# Altium PCB PCI Express_16765X6890_64PIN_Low profile_Clear.PCBDOC (part 4 of 9)
Units mm, origin at the board's own origin, x right, y up, seen from the top; angles counter-clockwise.
Board outline 80.71 x 137.84 mm, 6 copper layers (Top Layer, Layer 2 (GND), Layer 3, Layer 4, Layer 5 (AGND), Bottom Layer), stack 1.571 mm thick; 507 components, 297 nets, 1544 pads, 616 vias.
Unrouted connection lines stored in the file: 101.
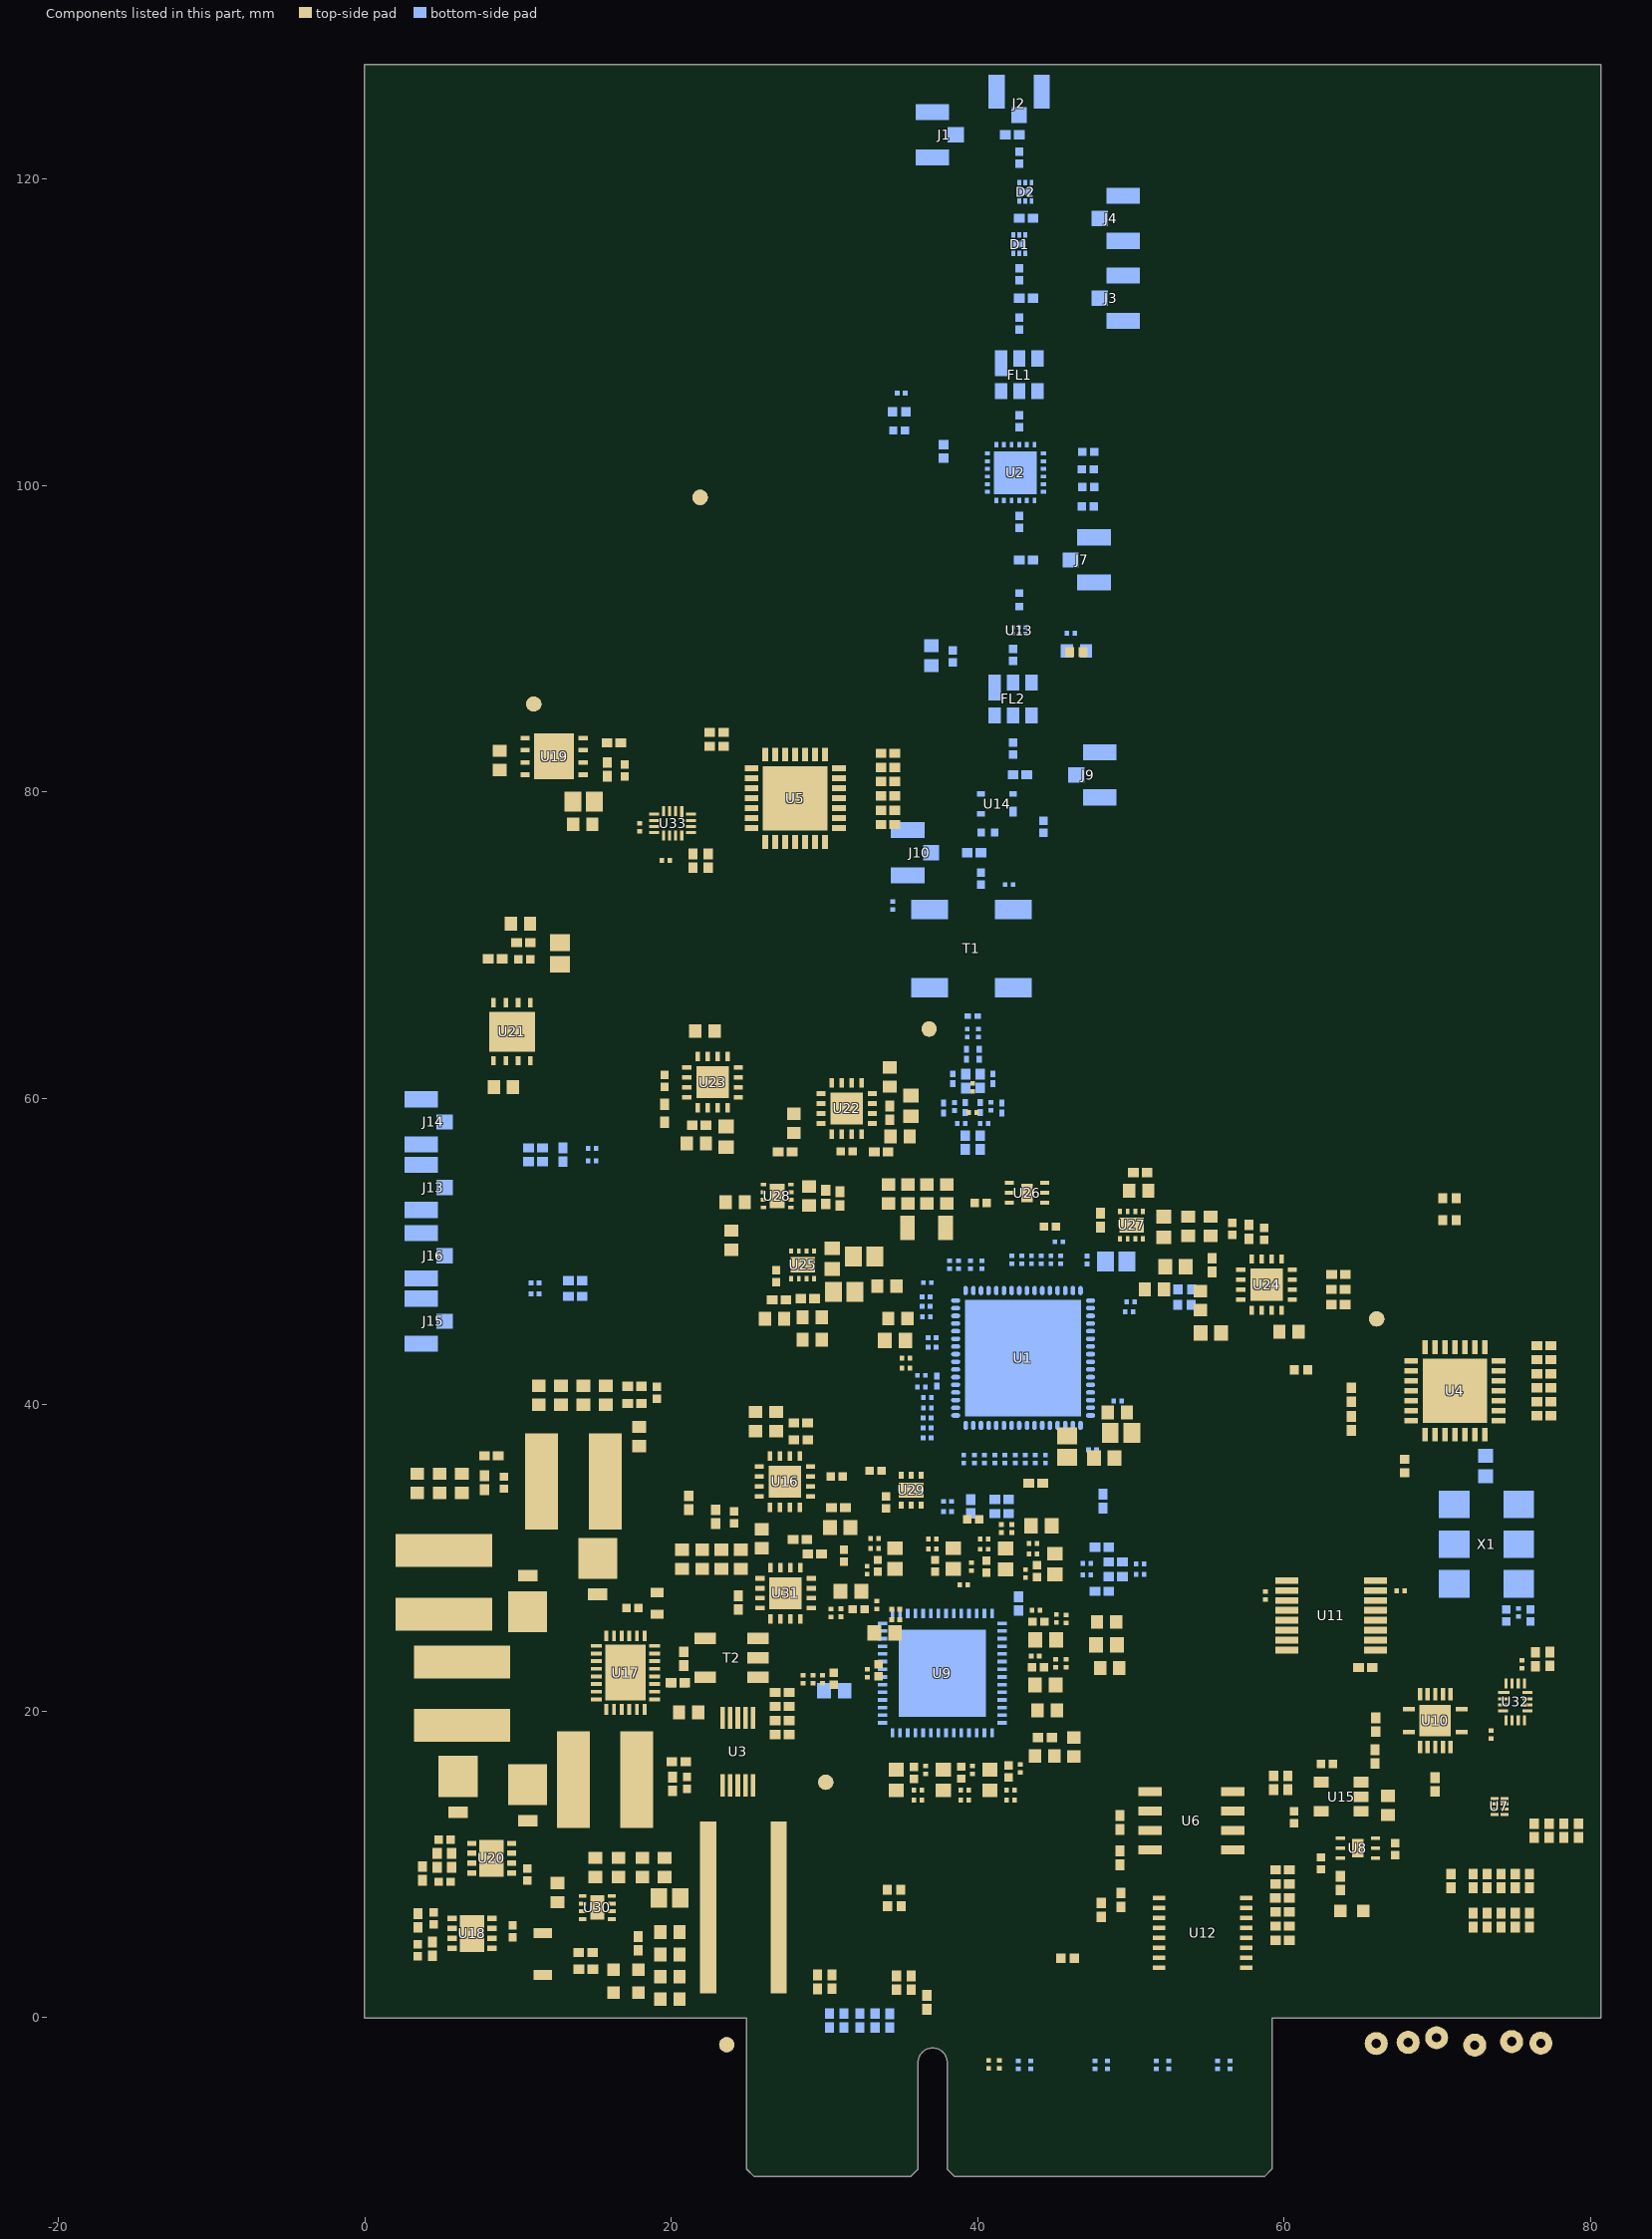
[diagram p4: the components of this part, seen from the top]

## Part data (continued)
FB21: library part Ferrite, Case/Package=0603, Case Code (Metric)=1608, Current Rating=3A, DC Resistance (DCR)=25mR, Frequency=100MHz, Manufacturer 1=Murata, Manufacturer Part Number 1=BLM18SG121TN1D, Max Operating Temperature=125°C, Min Operating Temperature=-55°C, Package Quantity=1, Supplier Part Number 1=490-3996-1-ND, Tolerance=25%, Case Code (Imperial)=0603, ComponentLink1Description=https://datasheet.ciiva.com/1012/l0110s0100blm18s-1012624.pdf?src-supplier=Digi-Key, ComponentLink1URL=https://datasheet.ciiva.com/1012/l0110s0100blm18s-1012624.pdf?src-supplier=Digi-Key, ComponentLink2Description=https://datasheet.ciiva.com/18093/getdatasheetpartid-295885-18093249.pdf?src-supplier=Verical, ComponentLink2URL=https://datasheet.ciiva.com/18093/getdatasheetpartid-295885-18093249.pdf?src-supplier=Verical, ComponentLink3Description=https://datasheet.ciiva.com/11799/0900766b811b5866-11799181.pdf?src-supplier=RSComponents, ComponentLink3URL=https://datasheet.ciiva.com/11799/0900766b811b5866-11799181.pdf?src-supplier=RSComponents, ComponentLink4Description=https://datasheet.ciiva.com/41449/001171723-da-01-en-chip-drossel0603-120r-3000ma-1-6x0-8mm-41449353.pdf?src-supplier=Conrad, ComponentLink4URL=https://datasheet.ciiva.com/41449/001171723-da-01-en-chip-drossel0603-120r-3000ma-1-6x0-8mm-41449353.pdf?src-supplier=Conrad, ComponentLink5Description=https://datasheet.ciiva.com/41449/001172312-da-01-en-drossel-0603-120r-1-6x0-8mm-10000st-41449675.pdf?src-supplier=Conrad, ComponentLink5URL=https://datasheet.ciiva.com/41449/001172312-da-01-en-drossel-0603-120r-1-6x0-8mm-10000st-41449675.pdf?src-supplier=Conrad, ComponentLink6Description=https://datasheet.ciiva.com/1012/l0110s0100blm18s-1012625.pdf?src-supplier=Digi-Key, ComponentLink6URL=https://datasheet.ciiva.com/1012/l0110s0100blm18s-1012625.pdf?src-supplier=Digi-Key, ComponentLink7Description=https://datasheet.ciiva.com/8021/5151-8021511.pdf?src-supplier=Element14, ComponentLink7URL=https://datasheet.ciiva.com/8021/5151-8021511.pdf?src-supplier=Element14, ComponentLink8Description=https://datasheet.ciiva.com/8021/5151-8021512.pdf?src-supplier=Element14, ComponentLink8URL=https://datasheet.ciiva.com/8021/5151-8021512.pdf?src-supplier=Element14, ComponentLink9Description=https://datasheet.ciiva.com/14122/blm-series-eng-tds-14122906.pdf?src-supplier=Distrelec, ComponentLink9URL=https://datasheet.ciiva.com/14122/blm-series-eng-tds-14122906.pdf?src-supplier=Distrelec, ComponentLink10Description=https://datasheet.ciiva.com/16395/l0110s0100blm18s-16395498.pdf?src-supplier=Future+Electronics, ComponentLink10URL=https://datasheet.ciiva.com/16395/l0110s0100blm18s-16395498.pdf?src-supplier=Future+Electronics, ComponentLink11Description=https://datasheet.ciiva.com/1012/l0110s0100blm18s-1012623.pdf?src-supplier=Digi-Key, ComponentLink11URL=https://datasheet.ciiva.com/1012/l0110s0100blm18s-1012623.pdf?src-supplier=Digi-Key, ComponentLink12Description=https://datasheet.ciiva.com/17246/l0110s0100blm18s-17246943.pdf?src-supplier=Avnet+Europe, ComponentLink12URL=https://datasheet.ciiva.com/17246/l0110s0100blm18s-17246943.pdf?src-supplier=Avnet+Europe, Core Material=Ferrite, Depth=0.8mm, Height=0.8mm, Impedance=120R, Lead Free="Lead Free", Length=1.6mm, Material=Steel,Ferrite, Max Current Rating=3A, Max DC Current=3A, Number of Circuits=1, Number of Lines=1, Number of Pins=2, Packaging="Tape and Reel", Pricing 1="1=0.14000, 10=0.11600, 25=0.09040, 50=0.07500, 100=0.06460, 250=0.05172, 500=0.04654, 1000=0.03878, 5000=0.03619 (USD)", REACH SVHC="No SVHC", RoHS=Yes, Shielding=Unshielded, Stock 1=186560, Supplier 1=Digi-Key, Termination=SMD/SMT, Test Frequency=100MHz, Width=0.8mm
FID1 FID2 FID3 FID4 FID5 FID6: library part Fid
FL1 FL2: "SAW Filter 1570 MHz", In Power (max)="10 dBm", BW="80 MHz", Fc="1570 MHz", IL (max)="4.2 dB", Impedance In, Out="50 Ohm"
J1 J2 J3 J4 J7 J9 J10 J13 J14 J15 J16: "Ultra Miniature Coaxial Connector Jack, 60 V, 50 Ohm, -40 to 90 degC, RoHS, Tape and Reel", Maximum Frequency="6 GHz", Operating Temperature Range="- 40 C to + 90 C", Supplier Part Number 1=62X0488, Body Material="Liquid Crystal Polymer (LCP)", Brand="TE Connectivity / AMP", ComponentLink1Description="Manufacturer URL", ComponentLink1URL=http://www.te.com, ComponentLink2Description=Datasheet, ComponentLink2URL=http://www.te.com/commerce/DocumentDelivery/DDEController?Action=srchrtrv&DocNm=1909763&DocType=Customer+Drawing&DocLang=English, Contact Material="Copper Alloy", Contact Plating=Gold, DatasheetVersion="Rev. B2", Factory Pack Quantity=5000, Gender="Jack (Female)", Impedance="50 Ohms", Mounting Technology="Surface Mount", Orientation=Straight, PackageDescription="3-Pin Surface Mount Device, Body 2.6 x 2.6 mm", PackageReference=SMD, Packaging=Reel, Product=Connectors, Product Category="RF Connectors / Coaxial Connectors", RF Series=UMCC, RoHS=Details, Supplier 1=Newark, Supplier 2=Farnell, Supplier 3=Digi-Key, Supplier 4=Digi-Key, Supplier 5=Digi-Key, Supplier Part Number 2=2781689, Supplier Part Number 3=A118077TR-ND, Supplier Part Number 4=A118077CT-ND, Supplier Part Number 5=A118077DKR-ND
L1: library part IND_WW, Case/Package=0402, Case Code (Metric)=1005, Current Rating=540mA, DC Resistance (DCR)=140mR, Manufacturer 1=Murata, Manufacturer Part Number 1=LQW15AN8N2J00D, Max Operating Temperature=125°C, Min Operating Temperature=-55°C, Package Quantity=1, Self Resonant Frequency=5.5GHz, Supplier Part Number 1=490-1144-1-ND, Test Frequency=100MHz, Tolerance=5%, Case Code (Imperial)=0402, ComponentLink1Description=https://datasheet.ciiva.com/11799/0900766b8090d800-11799046.pdf?src-supplier=RSComponents, ComponentLink1URL=https://datasheet.ciiva.com/11799/0900766b8090d800-11799046.pdf?src-supplier=RSComponents, ComponentLink2Description=https://datasheet.ciiva.com/1042/l0075s0080lqw15a-00-1042176.pdf?src-supplier=Digi-Key, ComponentLink2URL=https://datasheet.ciiva.com/1042/l0075s0080lqw15a-00-1042176.pdf?src-supplier=Digi-Key, ComponentLink3Description=https://datasheet.ciiva.com/17278/l0075s0080lqw15a-00-17278345.pdf?src-supplier=Avnet+Europe, ComponentLink3URL=https://datasheet.ciiva.com/17278/l0075s0080lqw15a-00-17278345.pdf?src-supplier=Avnet+Europe, ComponentLink4Description=https://datasheet.ciiva.com/8506/l0075s0080lqw15a-00-8506028.pdf?src-supplier=Avnet, ComponentLink4URL=https://datasheet.ciiva.com/8506/l0075s0080lqw15a-00-8506028.pdf?src-supplier=Avnet, ComponentLink5Description=https://datasheet.ciiva.com/1042/l0075s0080lqw15a-00-1042174.pdf?src-supplier=Digi-Key, ComponentLink5URL=https://datasheet.ciiva.com/1042/l0075s0080lqw15a-00-1042174.pdf?src-supplier=Digi-Key, ComponentLink6Description=https://datasheet.ciiva.com/1042/l0075s0080lqw15a-00-1042175.pdf?src-supplier=Digi-Key, ComponentLink6URL=https://datasheet.ciiva.com/1042/l0075s0080lqw15a-00-1042175.pdf?src-supplier=Digi-Key, Core Material=Air,Ferrite, DC Current=540mA, Depth=0.7mm, Height=0.5mm, Inductance=8.2nH, Lead Free="Lead Free", Length=1mm, Max DC Current=540mA, Military Standard=Not, Mount="Surface Mount", Packaging="Tape and Reel", Pricing 1="1=0.17000, 10=0.15500, 100=0.10350, 500=0.08626, 1000=0.07245, 2500=0.06210 (USD)", Q Factor=25, Radiation Hardening=No, RoHS=Yes, Shielding=Unshielded, Stock 1=37106, Supplier 1=Digi-Key, Termination=SMD/SMT, Weight=2.8E-05oz, Width=0.02inch
L2: library part IND_WW, Case/Package=0402, Case Code (Metric)=1005, Current Rating=350mA, DC Resistance (DCR)=380mR, Inductance Tolerance=5%, Manufacturer 1=TDK, Manufacturer Part Number 1=MLK1005S8N2D, Max Operating Temperature=125°C, Min Operating Temperature=-55°C, Package Quantity=10000, Self Resonant Frequency=6GHz, Supplier Part Number 1=445-1466-1-ND, Test Frequency=100MHz, Case Code (Imperial)=0402, ComponentLink1Description=https://datasheet.ciiva.com/15160/getdatasheetpartid-160177-15160588.pdf?src-supplier=Verical, ComponentLink1URL=https://datasheet.ciiva.com/15160/getdatasheetpartid-160177-15160588.pdf?src-supplier=Verical, ComponentLink2Description=https://datasheet.ciiva.com/5707/321063-5707269.pdf?src-supplier=Farnell, ComponentLink2URL=https://datasheet.ciiva.com/5707/321063-5707269.pdf?src-supplier=Farnell, ComponentLink3Description=https://datasheet.ciiva.com/6685/mlk1005-6685740.pdf?src-supplier=Digi-Key, ComponentLink3URL=https://datasheet.ciiva.com/6685/mlk1005-6685740.pdf?src-supplier=Digi-Key, ComponentLink4Description=https://datasheet.ciiva.com/22710/321063-22710636.pdf?src-supplier=Element14, ComponentLink4URL=https://datasheet.ciiva.com/22710/321063-22710636.pdf?src-supplier=Element14, ComponentLink5Description=https://datasheet.ciiva.com/6685/mlk1005-6685738.pdf?src-supplier=Digi-Key, ComponentLink5URL=https://datasheet.ciiva.com/6685/mlk1005-6685738.pdf?src-supplier=Digi-Key, Core Material=Non-Magnetic,Ceramic, DC Current=350mA, Depth=0.5mm, Height=0.5mm, Height - Seated (Max)=0.024inch, Inductance=8.2nH, Lead Free="Lead Free", Length=1mm, Max DC Current=350mA, Military Standard=Not, Mount="Surface Mount", Number of Pins=2, Packaging="Tape and Reel", Pricing 1="1=0.10000, 10=0.05200, 100=0.03450, 500=0.02876, 1000=0.02415, 2500=0.02070 (USD)", Q Factor=25, Radiation Hardening=No, REACH SVHC="No SVHC", RoHS=Yes, Shielding=Unshielded, Stock 1=18018, Supplier 1=Digi-Key, Termination=SMD/SMT, Tolerance=5%, Width=0.02inch
L3: library part CDRH5D28NP-5R3NC, "INDUCTOR POWER 5.3UH 1.90A SMD", Inductance="4.2 µH", Supplier Part Number 1=308-2193-1-ND, Supplier 1=Digi-Key
L4: library part Inductor, "Fixed Inductors 6.8uH", Case/Package=0603, Case Code (Metric)=1608, Current Rating=75mA, DC Resistance (DCR)=900mR, Manufacturer 1=TDK, Manufacturer Part Number 1=GLFR1608T150M-LR, Max DC Current=220mA, Max Operating Temperature=105°C, Min Operating Temperature=-40°C, Package Quantity=4000, Supplier Part Number 1=445-6151-1-ND, Tolerance=20%, Case Code (Imperial)=0603, ComponentLink1Description=https://datasheet.ciiva.com/1040/glfrseries-1040824.pdf?src-supplier=Digi-Key, ComponentLink1URL=https://datasheet.ciiva.com/1040/glfrseries-1040824.pdf?src-supplier=Digi-Key, ComponentLink2Description=https://datasheet.ciiva.com/1040/glfrseries-1040825.pdf?src-supplier=Digi-Key, ComponentLink2URL=https://datasheet.ciiva.com/1040/glfrseries-1040825.pdf?src-supplier=Digi-Key, ComponentLink3Description=https://datasheet.ciiva.com/1040/glfrseries-1040826.pdf?src-supplier=Digi-Key, ComponentLink3URL=https://datasheet.ciiva.com/1040/glfrseries-1040826.pdf?src-supplier=Digi-Key, Height=0.031inch, Inductance=15uH, Length=1.6mm, Mount="Surface Mount", Packaging="Tape and Reel", Pricing 1="1=0.27000, 10=0.24400, 100=0.16760, 500=0.14324, 1000=0.10971 (USD)", RoHS=Yes, Saturation Current=75mA, Shielding=Shielded, Stock 1=4756, Supplier 1=Digi-Key, Termination=SMD/SMT, Width=0.8mm
L5 L6: Inductance [µH]=8.2, Part Number=CDRH5D28NP-8R2, Supplier 2=Digi-Key, Supplier Part Number 2=308-2309-6-ND
L7: library part CDRH5D28NP-100NC, "Inductor Power Shielded Drum Core 10uH 30% 100KHz Ferrite 1.3A 65mOhm DCR T/R", Inductance [µH]=8.2, Part Number=CDRH5D28NP-8R2, Supplier 2=Digi-Key, Supplier Part Number 2=308-2309-6-ND
L8: library part Inductor, Case/Package=1206, Case Code (Metric)=3216, Current Rating=1.2A, DC Resistance (DCR)=120mR, Inductance Tolerance=20%, Manufacturer 1=Murata, Manufacturer Part Number 1=LQM31PN1R0M00L, Max Operating Temperature=125°C, Min Operating Temperature=-55°C, Package Quantity=3000, Self Resonant Frequency=60MHz, Supplier Part Number 1=490-4039-1-ND, Test Frequency=1MHz, Case Code (Imperial)=1206, ComponentLink1Description=https://datasheet.ciiva.com/30490/0900766b812561f7-30490179.pdf?src-supplier=RSComponents, ComponentLink1URL=https://datasheet.ciiva.com/30490/0900766b812561f7-30490179.pdf?src-supplier=RSComponents, ComponentLink2Description=https://datasheet.ciiva.com/18089/getdatasheetpartid-153105-18089643.pdf?src-supplier=Verical, ComponentLink2URL=https://datasheet.ciiva.com/18089/getdatasheetpartid-153105-18089643.pdf?src-supplier=Verical, ComponentLink3Description=https://datasheet.ciiva.com/16456/l0075s0104lqm31p-00-16456023.pdf?src-supplier=Future+Electronics, ComponentLink3URL=https://datasheet.ciiva.com/16456/l0075s0104lqm31p-00-16456023.pdf?src-supplier=Future+Electronics, ComponentLink4Description=https://datasheet.ciiva.com/17278/l0075s0104lqm31p-00-17278552.pdf?src-supplier=Avnet+Europe, ComponentLink4URL=https://datasheet.ciiva.com/17278/l0075s0104lqm31p-00-17278552.pdf?src-supplier=Avnet+Europe, ComponentLink5Description=https://datasheet.ciiva.com/4955/product-4955835.pdf?src-supplier=Mouser, ComponentLink5URL=https://datasheet.ciiva.com/4955/product-4955835.pdf?src-supplier=Mouser, ComponentLink6Description=https://datasheet.ciiva.com/8510/l0075s0104lqm31p-00-8510971.pdf?src-supplier=Avnet, ComponentLink6URL=https://datasheet.ciiva.com/8510/l0075s0104lqm31p-00-8510971.pdf?src-supplier=Avnet, Core Material=Ferrite, DC Current=1.2A, Depth=1.8mm, Height=0.95mm, Height - Seated (Max)=0.037inch, Inductance=1uH, Lead Free="Lead Free", Length=3.4mm, Max DC Current=1.2A, Military Standard=Not, Mount="Surface Mount", Packaging="Tape and Reel", Pricing 1="1=0.40000, 10=0.35100, 100=0.24160, 500=0.20648, 1000=0.15815 (USD)", Radiation Hardening=No, REACH SVHC="No SVHC", RoHS=Yes, Shielding=Shielded, Stock 1=7502, Supplier 1=Digi-Key, Termination=SMD/SMT, Tolerance=20%, Width=0.063inch
L9: "FIXED IND 2.2UH 1.4A 72 MOHM SMD", Case/Package=Nonstandard, Current Rating=1.4A, DC Resistance (DCR)=72mR, Inductance=2.2uH, Manufacturer 1=TDK, Max Operating Temperature=105°C, Min Operating Temperature=-40°C, Package Quantity=2000, Supplier Part Number 1=445-4200-1-ND, Test Frequency=1MHz, Tolerance=20%, ComponentLink1Description=http://components.arrow.com/part/dataview/0323_01997643?src-supplier=Arrow+Europe, ComponentLink1URL=http://components.arrow.com/part/dataview/0323_01997643?src-supplier=Arrow+Europe, ComponentLink2Description=https://media.digikey.com/pdf/Data%20Sheets/TDK%20PDFs/VLF3012S.pdf?src-supplier=Digi-Key, ComponentLink2URL=https://media.digikey.com/pdf/Data%20Sheets/TDK%20PDFs/VLF3012S.pdf?src-supplier=Digi-Key, ComponentLink3Description=http://www.tdk.com/s_details.php?class_code=TJA024&item_roots_key=VLF3012ST-2R2M1R4C46421010&item_name=VLF3012ST-2R2M1R4&src-supplier=Avnet, ComponentLink3URL=http://www.tdk.com/s_details.php?class_code=TJA024&item_roots_key=VLF3012ST-2R2M1R4C46421010&item_name=VLF3012ST-2R2M1R4&src-supplier=Avnet, ComponentLink4Description=https://product.tdk.com/en/search/inductor/inductor/smd/info?part_no=VLF3010AT-2R2M1R0&src-supplier=Mouser, ComponentLink4URL=https://product.tdk.com/en/search/inductor/inductor/smd/info?part_no=VLF3010AT-2R2M1R0&src-supplier=Mouser, Composition=Wirewound, Core Material=Ferrite, DC Current=1.4A, Depth=2.8mm, Height=1.2mm, Height - Seated (Max)=0.047inch, Lead Free="Lead Free", Length=0.118inch, Manufacturer Part Number 1=VLF3012ST-2R2M1R4, Max DC Current=1.4A, Military Standard=Not, Mount="Surface Mount", Packaging="Tape and Reel", Pricing 1="1=1.09000, 10=1.00900, 100=0.72970 (USD)", RoHS=Yes, Shielding=Shielded, Stock 1=348, Supplier 1=Digi-Key, Termination=SMD/SMT, Width=0.11inch
R1 R3 R6 R8 R10 R12: library part Resistor, Case/Package=0201, Case Code (Metric)=0603, Manufacturer 1=Panasonic, Manufacturer Part Number 1=ERJ-1GNF10R0C, Max Operating Temperature=125°C, Max Power Dissipation=50mW, Min Operating Temperature=-55°C, Package Quantity=15000, Supplier Part Number 1=2396827, Temperature Coefficient=200ppm/°C, Tolerance=1%, Voltage Rating=25V, Case Code (Imperial)=0201, ComponentLink1Description=https://datasheet.ciiva.com/17212/aoa0000ce2-17212053.pdf?src-supplier=Avnet+Europe, ComponentLink1URL=https://datasheet.ciiva.com/17212/aoa0000ce2-17212053.pdf?src-supplier=Avnet+Europe, ComponentLink2Description=https://datasheet.ciiva.com/9194/aoa0000ce2-9194214.pdf?src-supplier=Avnet, ComponentLink2URL=https://datasheet.ciiva.com/9194/aoa0000ce2-9194214.pdf?src-supplier=Avnet, ComponentLink3Description=https://datasheet.ciiva.com/16201/aoa0000ce2-16201496.pdf?src-supplier=Future+Electronics, ComponentLink3URL=https://datasheet.ciiva.com/16201/aoa0000ce2-16201496.pdf?src-supplier=Future+Electronics, ComponentLink4Description=https://datasheet.ciiva.com/16511/aoa0000ce2-16511388.pdf?src-supplier=Avnet+Asia, ComponentLink4URL=https://datasheet.ciiva.com/16511/aoa0000ce2-16511388.pdf?src-supplier=Avnet+Asia, ComponentLink5Description=https://datasheet.ciiva.com/43467/1678782-43467006.pdf?src-supplier=Farnell, ComponentLink5URL=https://datasheet.ciiva.com/43467/1678782-43467006.pdf?src-supplier=Farnell, ComponentLink6Description=https://datasheet.ciiva.com/24161/aoa0000ce2-24161967.pdf?src-supplier=Mouser, ComponentLink6URL=https://datasheet.ciiva.com/24161/aoa0000ce2-24161967.pdf?src-supplier=Mouser, Composition="Thick Film", Contact Plating=Tin,Matte, Height=0.01inch, Lead Free="Lead Free", Length=0.6mm, Mount="Surface Mount", Number of Pins=2, Number of Terminations=2, Packaging="Tape and Reel", Power Rating=50mW, Radiation Hardening=No, REACH SVHC="No SVHC", Resistance=10R, RoHS=Yes, Stock 1=135000, Supplier 1=Farnell, Termination=SMD/SMT, Voltage Rating (DC)=25V, Weight=6E-06oz, Width=0.012inch, Working Voltage=25V
R2 R4 R11 R13 R20 R22 R25 R26 R36 R39 R40 R42 R43 R44 R45 R47 R48 R49 R77 R78 R89 R90 R91 R92 R93 R94 R96 R97 R98 R99 R101 R104 R105 R111 R112 R116 R117 R118 R119 R120 R121 R122 R129 R130 R131 R134 R135 R141 R142 R143: library part Resistor, Case/Package=0402, Case Code (Metric)=1005, Manufacturer 1=Yageo, Manufacturer Part Number 1=RC0402JR-070RL, Max Operating Temperature=155°C, Max Power Dissipation=63mW, Min Operating Temperature=-55°C, Package Quantity=1, Power Rating=62.5mW, Supplier Part Number 1=311-0.0JRCT-ND, Temperature Coefficient=200ppm/°C, Tolerance=5%, Voltage Rating=50V, Case Code (Imperial)=0402, ComponentLink1Description=https://datasheet.ciiva.com/2452/pyu-rc0402-51-rohs-l-6-2452608.pdf?src-supplier=Digi-Key, ComponentLink1URL=https://datasheet.ciiva.com/2452/pyu-rc0402-51-rohs-l-6-2452608.pdf?src-supplier=Digi-Key, ComponentLink2Description=https://datasheet.ciiva.com/11808/0900766b80c66297-11808195.pdf?src-supplier=RSComponents, ComponentLink2URL=https://datasheet.ciiva.com/11808/0900766b80c66297-11808195.pdf?src-supplier=RSComponents, ComponentLink3Description=https://datasheet.ciiva.com/2452/pyu-r-int-thick-7-2452609.pdf?src-supplier=Digi-Key, ComponentLink3URL=https://datasheet.ciiva.com/2452/pyu-r-int-thick-7-2452609.pdf?src-supplier=Digi-Key, ComponentLink4Description=https://datasheet.ciiva.com/22747/1018594-22747515.pdf?src-supplier=Element14, ComponentLink4URL=https://datasheet.ciiva.com/22747/1018594-22747515.pdf?src-supplier=Element14, ComponentLink5Description=https://datasheet.ciiva.com/7983/1018594-7983535.pdf?src-supplier=Element14, ComponentLink5URL=https://datasheet.ciiva.com/7983/1018594-7983535.pdf?src-supplier=Element14, ComponentLink6Description=https://datasheet.ciiva.com/2452/pyu-r-int-thick-7-2452610.pdf?src-supplier=Digi-Key, ComponentLink6URL=https://datasheet.ciiva.com/2452/pyu-r-int-thick-7-2452610.pdf?src-supplier=Digi-Key, ComponentLink7Description=https://datasheet.ciiva.com/8896/pyu-rc0402-51-rohs-l-6-8896201.pdf?src-supplier=Avnet, ComponentLink7URL=https://datasheet.ciiva.com/8896/pyu-rc0402-51-rohs-l-6-8896201.pdf?src-supplier=Avnet, ComponentLink8Description=https://datasheet.ciiva.com/28386/pyu-rc0402-51-rohs-l-6-28386633.pdf?src-supplier=Avnet+Europe, ComponentLink8URL=https://datasheet.ciiva.com/28386/pyu-rc0402-51-rohs-l-6-28386633.pdf?src-supplier=Avnet+Europe, ComponentLink9Description=https://datasheet.ciiva.com/15189/getdatasheetpartid-326379-15189533.pdf?src-supplier=Verical, ComponentLink9URL=https://datasheet.ciiva.com/15189/getdatasheetpartid-326379-15189533.pdf?src-supplier=Verical, Composition="Thick Film", Contact Plating=Tin,Matte, Depth=0.5mm, Features="Moisture Resistant", Height=0.016inch, Lead Free="Lead Free", Length=1mm, Military Standard=Not, Number of Terminations=2, Packaging="Tape and Reel", Pricing 1="1=0.10000, 10=0.01200, 25=0.00920, 50=0.00680, 100=0.00510, 250=0.00388, 500=0.00308, 1000=0.00227, 5000=0.00163 (USD)", Radiation Hardening=No, REACH SVHC=Unknown, Resistance=0mR, RoHS=Yes, Supplier 1=Digi-Key, Termination=SMD/SMT, Width=0.02inch
  R2 R4 R11 R13 R20 R77 R78 R89 R90 R91 R92 R93 R94 R96 R97 R98 R101 R111 R112 R116 R117 R118 R119 R120 R121 R122 R129 R130 R131 R134 R135 R141 R142 R143: Stock 1=69822252
  R22 R25 R26 R36 R39 R40 R42 R43 R44 R45 R47 R48 R49 R99 R104 R105: Stock 1=71594280
R5 R7 R9: library part Resistor, Case/Package=0201, Case Code (Metric)=0603, Manufacturer 1=Panasonic, Manufacturer Part Number 1=ERJ-1GNF49R9C, Max Operating Temperature=125°C, Max Power Dissipation=50mW, Min Operating Temperature=-55°C, Package Quantity=15000, Supplier Part Number 1=P123049CT-ND, Temperature Coefficient=200ppm/°C, Tolerance=1%, Voltage Rating=25V, Case Code (Imperial)=0201, ComponentLink1Description=https://datasheet.ciiva.com/24033/aoa0000ce2-24033580.pdf?src-supplier=Mouser, ComponentLink1URL=https://datasheet.ciiva.com/24033/aoa0000ce2-24033580.pdf?src-supplier=Mouser, ComponentLink2Description=https://datasheet.ciiva.com/16201/aoa0000ce2-16201389.pdf?src-supplier=Future+Electronics, ComponentLink2URL=https://datasheet.ciiva.com/16201/aoa0000ce2-16201389.pdf?src-supplier=Future+Electronics, Composition="Thick Film", Contact Plating=Tin,Matte, Height=0.01inch, Lead Free="Lead Free", Length=0.6mm, Mount="Surface Mount", Number of Terminations=2, Packaging="Tape and Reel", Power Rating=50mW, Pricing 1="1=0.10000, 10=0.05500, 100=0.02240, 1000=0.01007, 2500=0.00874, 5000=0.00722 (USD)", Radiation Hardening=No, Resistance=49.9R, RoHS=Yes, Stock 1=47286, Supplier 1=Digi-Key, Width=0.3mm, Working Voltage=25V
R14: library part Resistor, Case/Package=0201, Case Code (Metric)=0603, Manufacturer 1=Panasonic, Manufacturer Part Number 1=ERJ-1GEF1000C, Max Operating Temperature=125°C, Max Power Dissipation=50mW, Min Operating Temperature=-55°C, Package Quantity=15000, Supplier Part Number 1=667-ERJ-1GEF1000C, Temperature Coefficient=200ppm/°C, Tolerance=1%, Voltage Rating=25V, Voltage Rating (DC)=15V, Case Code (Imperial)=0201, ComponentLink1Description=https://datasheet.ciiva.com/16427/erj-1gef1000c-16427637.pdf?src-supplier=Future+Electronics, ComponentLink1URL=https://datasheet.ciiva.com/16427/erj-1gef1000c-16427637.pdf?src-supplier=Future+Electronics, ComponentLink2Description=https://datasheet.ciiva.com/16766/70260683-16766261.pdf?src-supplier=Allied+Electronics, ComponentLink2URL=https://datasheet.ciiva.com/16766/70260683-16766261.pdf?src-supplier=Allied+Electronics, ComponentLink3Description=https://datasheet.ciiva.com/16776/70260683-16776517.pdf?src-supplier=Allied+Electronics, ComponentLink3URL=https://datasheet.ciiva.com/16776/70260683-16776517.pdf?src-supplier=Allied+Electronics, ComponentLink4Description=https://datasheet.ciiva.com/7830/1678796-7830951.pdf?src-supplier=Element14, ComponentLink4URL=https://datasheet.ciiva.com/7830/1678796-7830951.pdf?src-supplier=Element14, Composition="Thick Film", Contact Plating=Tin, Depth=0.3mm, Height=0.23mm, Lead Free="Lead Free", Length=0.6mm, Military Standard=Not, Mount="Surface Mount", Number of Terminations=2, Packaging="Tape and Reel", Power Rating=50mW, Pricing 1="1=0.10000, 10=0.03100, 100=0.01400, 1000=0.01000, 5000=0.00700, 10000=0.00600 (USD)", REACH SVHC=Unknown, Resistance=100R, RoHS=Yes, Stock 1=517, Supplier 1=Mouser, Termination=SMD/SMT, Width=0.012inch
R15: "RES SMD 5 MOHM 5W 4320 WIDE", Case/Package=Metal, Manufacturer=Ohmite, Max Operating Temperature=155°C, Max Power Dissipation=5W, Min Operating Temperature=-55°C, Package Quantity=1, Resistance=5mR, Supplier Part Number 1=FCSL110R005FERCT-ND, Temperature Coefficient=50ppm/°C, Tolerance=1%, ComponentLink1Description=https://datasheet.ciiva.com/2484/res-fcsl-2484643.pdf?src-supplier=Digi-Key, ComponentLink1URL=https://datasheet.ciiva.com/2484/res-fcsl-2484643.pdf?src-supplier=Digi-Key, ComponentLink2Description=https://datasheet.ciiva.com/2484/res-fcsl-2484644.pdf?src-supplier=Digi-Key, ComponentLink2URL=https://datasheet.ciiva.com/2484/res-fcsl-2484644.pdf?src-supplier=Digi-Key, ComponentLink3Description=https://datasheet.ciiva.com/2484/res-fcsl-2484645.pdf?src-supplier=Digi-Key, ComponentLink3URL=https://datasheet.ciiva.com/2484/res-fcsl-2484645.pdf?src-supplier=Digi-Key, ComponentLink4Description=https://datasheet.ciiva.com/6181/fcsl-6181333.pdf?src-supplier=Farnell, ComponentLink4URL=https://datasheet.ciiva.com/6181/fcsl-6181333.pdf?src-supplier=Farnell, ComponentLink5Description=https://datasheet.ciiva.com/46422/1812595-46422917.pdf?src-supplier=Element14, ComponentLink5URL=https://datasheet.ciiva.com/46422/1812595-46422917.pdf?src-supplier=Element14, ComponentLink6Description=https://datasheet.ciiva.com/8080/fcsl-8080343.pdf?src-supplier=Element14, ComponentLink6URL=https://datasheet.ciiva.com/8080/fcsl-8080343.pdf?src-supplier=Element14, Composition="Metal Foil", Depth=5mm, Features="Moisture Resistant", Height=0.028inch, Length=0.197inch, Manufacturer Part Number=FCSL110R005FER, Number of Pins=2, Number of Terminations=2, Packaging="Tape and Reel", Power Rating=5W, Pricing 1="1 = 2,79000, 10 = 2,47700, 25 = 2,29720, 50 = 2,16220, 100 = 1,89190, 250 = 1,62164, 500 = 1,35136 (USD)", REACH SVHC=Unknown, RoHS=Yes, Stock 1=3877, Supplier 1=Digi-Key, Termination=SMD/SMT, Width=11mm
R16: library part Resistor, Case/Package=0402, Manufacturer 1="TE Connectivity", Manufacturer Part Number 1=CPF0402B200KE, Max Operating Temperature=125°C, Min Operating Temperature=-55°C, Number of Resistors=1, Power Rating=63mW, Supplier Part Number 1=A119933CT-ND, Temperature Coefficient=25ppm/°C, Tolerance=0.1%, ComponentLink1Description=https://datasheet.ciiva.com/11812/0900766b80d1b755-11812552.pdf?src-supplier=RSComponents, ComponentLink1URL=https://datasheet.ciiva.com/11812/0900766b80d1b755-11812552.pdf?src-supplier=RSComponents, Depth=0.5mm, ELV=Compliant, Height=0.3mm, Length=1mm, Mount="Surface Mount", Number of Terminations=2, Packaging="Tape and Reel", Pricing 1="1=0,56000, 10=0,40200, 100=0,20890, 1000=0,11248, 2500=0,11096 (USD)", Resistance=200kR, RoHS=Yes, Stock 1=29021, Supplier 1=Digi-Key, Termination=Solder
R17 R18 R19 R28 R29 R31 R32 R34 R35 R37 R38 R113 R114 R115 R123 R124 R125 R126 R127 R128 R136 R138 R139 R140 R144 R145 R147: library part Resistor, Case/Package=0402, Case Code (Metric)=1005, Manufacturer 1=Yageo, Manufacturer Part Number 1=RC0402FR-071KL, Max Operating Temperature=155°C, Min Operating Temperature=-55°C, Power Rating=62.5mW, Supplier Part Number 1=311-1.00KLRCT-ND, Temperature Coefficient=100ppm/°C, Tolerance=1%, Voltage Rating=50V, Case Code (Imperial)=0402, ComponentLink1Description=https://datasheet.ciiva.com/11819/0900766b80c66297-11819477.pdf?src-supplier=RSComponents, ComponentLink1URL=https://datasheet.ciiva.com/11819/0900766b80c66297-11819477.pdf?src-supplier=RSComponents, ComponentLink2Description=https://datasheet.ciiva.com/12666/pyu-rc0402-51-rohs-l-6-r-12666741.pdf?src-supplier=Mouser, ComponentLink2URL=https://datasheet.ciiva.com/12666/pyu-rc0402-51-rohs-l-6-r-12666741.pdf?src-supplier=Mouser, ComponentLink3Description=https://datasheet.ciiva.com/17063/pyu-rc0402-51-rohs-l-6-r-17063193.pdf?src-supplier=Future+Electronics, ComponentLink3URL=https://datasheet.ciiva.com/17063/pyu-rc0402-51-rohs-l-6-r-17063193.pdf?src-supplier=Future+Electronics, ComponentLink4Description=https://datasheet.ciiva.com/22747/1018594-22747513.pdf?src-supplier=Element14, ComponentLink4URL=https://datasheet.ciiva.com/22747/1018594-22747513.pdf?src-supplier=Element14, ComponentLink5Description=https://datasheet.ciiva.com/7849/1018594-7849869.pdf?src-supplier=Element14, ComponentLink5URL=https://datasheet.ciiva.com/7849/1018594-7849869.pdf?src-supplier=Element14, ComponentLink6Description=https://datasheet.ciiva.com/7983/1018594-7983502.pdf?src-supplier=Element14, ComponentLink6URL=https://datasheet.ciiva.com/7983/1018594-7983502.pdf?src-supplier=Element14, ComponentLink7Description=https://datasheet.ciiva.com/7849/1018594-7849871.pdf?src-supplier=Element14, ComponentLink7URL=https://datasheet.ciiva.com/7849/1018594-7849871.pdf?src-supplier=Element14, Composition="Thick Film", Depth=0.5mm, Height=0.32mm, Lead Free="Lead Free", Length=1mm, Military Standard=Not, Number of Pins=2, Packaging="Tape and Reel", Pricing 1="1=0,10000, 10=0,01600, 100=0,00640, 1000=0,00289, 2500=0,00251, 5000=0,00207 (USD)", REACH SVHC=Unknown, Resistance=1kR, RoHS=Yes, Supplier 1=Digi-Key, Termination=SMD/SMT, Voltage Rating (DC)=50V, Width=0.5mm
  R17 R18 R19 R28 R29 R31 R32 R34 R35 R37 R38 R113 R114 R115 R123 R124 R125 R126 R127 R128 R138 R139 R140 R144 R145 R147: Stock 1=57541929
  R136: Stock 1=57132138
R21 R27: library part Resistor, Case/Package=0402, Case Code (Metric)=1005, Manufacturer 1=Vishay, Manufacturer Part Number 1=CRCW0402-10K0FKED, Max Operating Temperature=155°C, Max Power Dissipation=63mW, Min Operating Temperature=-55°C, Package Quantity=10, Supplier Part Number 1=52K6595, Temperature Coefficient=100ppm/°C, Tolerance=1%, Voltage Rating=50V, Case Code (Imperial)=0402, ComponentLink1Description=https://datasheet.ciiva.com/11809/0900766b80d98824-11809984.pdf?src-supplier=RSComponents, ComponentLink1URL=https://datasheet.ciiva.com/11809/0900766b80d98824-11809984.pdf?src-supplier=RSComponents, ComponentLink2Description=https://datasheet.ciiva.com/2463/dcrcwe3-2463025.pdf?src-supplier=Digi-Key, ComponentLink2URL=https://datasheet.ciiva.com/2463/dcrcwe3-2463025.pdf?src-supplier=Digi-Key, ComponentLink3Description=https://datasheet.ciiva.com/2463/dcrcwe3-2463026.pdf?src-supplier=Digi-Key, ComponentLink3URL=https://datasheet.ciiva.com/2463/dcrcwe3-2463026.pdf?src-supplier=Digi-Key, ComponentLink4Description=https://datasheet.ciiva.com/2463/dcrcwe3-2463027.pdf?src-supplier=Digi-Key, ComponentLink4URL=https://datasheet.ciiva.com/2463/dcrcwe3-2463027.pdf?src-supplier=Digi-Key, ComponentLink5Description=https://datasheet.ciiva.com/46385/1697337-46385560.pdf?src-supplier=Element14, ComponentLink5URL=https://datasheet.ciiva.com/46385/1697337-46385560.pdf?src-supplier=Element14, ComponentLink6Description=https://datasheet.ciiva.com/3255/dcrcwe3-3255961.pdf?src-supplier=Avnet, ComponentLink6URL=https://datasheet.ciiva.com/3255/dcrcwe3-3255961.pdf?src-supplier=Avnet, ComponentLink7Description=https://datasheet.ciiva.com/3255/dcrcwe3-3255962.pdf?src-supplier=Avnet, ComponentLink7URL=https://datasheet.ciiva.com/3255/dcrcwe3-3255962.pdf?src-supplier=Avnet, ComponentLink8Description=https://datasheet.ciiva.com/5547/dcrcwe3-109170-5547786.pdf?src-supplier=Mouser, ComponentLink8URL=https://datasheet.ciiva.com/5547/dcrcwe3-109170-5547786.pdf?src-supplier=Mouser, ComponentLink9Description=https://datasheet.ciiva.com/26316/fld-crcw-e3-data-en-26316618.pdf?src-supplier=Distrelec, ComponentLink9URL=https://datasheet.ciiva.com/26316/fld-crcw-e3-data-en-26316618.pdf?src-supplier=Distrelec, ComponentLink10Description=https://datasheet.ciiva.com/16208/dcrcwe3-16208525.pdf?src-supplier=Future+Electronics, ComponentLink10URL=https://datasheet.ciiva.com/16208/dcrcwe3-16208525.pdf?src-supplier=Future+Electronics, ComponentLink11Description=https://datasheet.ciiva.com/36856/1720486-36856909.pdf?src-supplier=Element14, ComponentLink11URL=https://datasheet.ciiva.com/36856/1720486-36856909.pdf?src-supplier=Element14, Composition="Thick Film", Contact Plating=Tin, Depth=0.5mm, Features="Automotive AEC-Q200", Height=0.35mm, Lead Free="Lead Free", Length=1mm, Military Standard=Not, Mount="Surface Mount", Number of Pins=2, Number of Terminations=2, Packaging="Tape and Reel", Power Rating=63mW, Radiation Hardening=No, REACH SVHC=Unknown, Resistance=10kR, RoHS=Yes, Stock 1=0, Supplier 1=Newark, Termination=SMD/SMT, Voltage Rating (DC)=50V, Weight=2.3E-05oz, Width=0.02inch
R23 R24 R53: library part Resistor, Case/Package=0402, Case Code (Metric)=1005, Manufacturer 1=Susumu, Manufacturer Part Number 1=RR0510P-103-D, Max Operating Temperature=125°C, Min Operating Temperature=-55°C, Power Rating=63mW, Supplier Part Number 1=RR05P10.0KDCT-ND, Temperature Coefficient=25ppm/°C, Tolerance=0.5%, Voltage Rating=25V, Case Code (Imperial)=0402, ComponentLink1Description=http://www.mouser.com/ds/2/392/susumu_RR_Data_Sheet-358748.pdf?src-supplier=Mouser, ComponentLink1URL=http://www.mouser.com/ds/2/392/susumu_RR_Data_Sheet-358748.pdf?src-supplier=Mouser, ComponentLink2Description=http://www.farnell.com/datasheets/2243860.pdf?src-supplier=Farnell, ComponentLink2URL=http://www.farnell.com/datasheets/2243860.pdf?src-supplier=Farnell, ComponentLink3Description=http://www.farnell.com/datasheets/1581132.pdf?src-supplier=Element14, ComponentLink3URL=http://www.farnell.com/datasheets/1581132.pdf?src-supplier=Element14, ComponentLink4Description=http://www.susumu-usa.com/pdf/products_12.pdf?src-supplier=Future+Electronics, ComponentLink4URL=http://www.susumu-usa.com/pdf/products_12.pdf?src-supplier=Future+Electronics, ComponentLink5Description=http://www.farnell.com/datasheets/2243860.pdf?src-supplier=Newark, ComponentLink5URL=http://www.farnell.com/datasheets/2243860.pdf?src-supplier=Newark, ComponentLink6Description=http://www.susumu.co.jp/common/pdf/n_catalog_partition05_en.pdf?src-supplier=Digi-Key, ComponentLink6URL=http://www.susumu.co.jp/common/pdf/n_catalog_partition05_en.pdf?src-supplier=Digi-Key, Composition="Thin Film", Lead Free="Lead Free", Number of Pins=2, Packaging="Tape and Reel", Pricing 1="1=0.10000, 10=0.07400, 100=0.02850, 1000=0.01254, 2500=0.01083, 5000=0.00969 (USD)", REACH SVHC=Unknown, Resistance=10kR, RoHS=Yes, Supplier 1=Digi-Key, Termination=SMD/SMT, Voltage Rating (DC)=25V
  R23 R24: Stock 1=957226
  R53: Stock 1=975953
R30: library part Resistor, Case/Package=0402, Case Code (Metric)=1005, Manufacturer 1=Yageo, Manufacturer Part Number 1=RC0402JR-074K7L, Max Operating Temperature=155°C, Max Power Dissipation=63mW, Min Operating Temperature=-55°C, Package Quantity=1, Supplier Part Number 1=311-4.7KJRCT-ND, Temperature Coefficient=100ppm/°C, Tolerance=5%, Voltage Rating=50V, Case Code (Imperial)=0402, ComponentLink1Description=https://datasheet.ciiva.com/2452/pyu-r-int-thick-7-2452611.pdf?src-supplier=Digi-Key, ComponentLink1URL=https://datasheet.ciiva.com/2452/pyu-r-int-thick-7-2452611.pdf?src-supplier=Digi-Key, ComponentLink2Description=https://datasheet.ciiva.com/2452/pyu-r-int-thick-7-2452612.pdf?src-supplier=Digi-Key, ComponentLink2URL=https://datasheet.ciiva.com/2452/pyu-r-int-thick-7-2452612.pdf?src-supplier=Digi-Key, ComponentLink3Description=https://datasheet.ciiva.com/2452/pyu-r-int-thick-7-2452613.pdf?src-supplier=Digi-Key, ComponentLink3URL=https://datasheet.ciiva.com/2452/pyu-r-int-thick-7-2452613.pdf?src-supplier=Digi-Key, ComponentLink4Description=https://datasheet.ciiva.com/46412/1018594-46412841.pdf?src-supplier=Element14, ComponentLink4URL=https://datasheet.ciiva.com/46412/1018594-46412841.pdf?src-supplier=Element14, ComponentLink5Description=https://datasheet.ciiva.com/16800/pyu-rc0402-51-rohs-l-6-r-16800266.pdf?src-supplier=Future+Electronics, ComponentLink5URL=https://datasheet.ciiva.com/16800/pyu-rc0402-51-rohs-l-6-r-16800266.pdf?src-supplier=Future+Electronics, ComponentLink6Description=https://datasheet.ciiva.com/7850/1018594-7850222.pdf?src-supplier=Element14, ComponentLink6URL=https://datasheet.ciiva.com/7850/1018594-7850222.pdf?src-supplier=Element14, ComponentLink7Description=https://datasheet.ciiva.com/7850/1018594-7850223.pdf?src-supplier=Element14, ComponentLink7URL=https://datasheet.ciiva.com/7850/1018594-7850223.pdf?src-supplier=Element14, Composition="Thick Film", Depth=0.5mm, Features="Moisture Resistant", Height=0.016inch, Lead Free="Lead Free", Length=0.039inch, Military Standard=Not, Number of Terminations=2, Packaging="Tape and Reel", Power Rating=63mW, Pricing 1="1=0,10000, 10=0,01300, 100=0,00530, 1000=0,00236, 2500=0,00205, 5000=0,00169 (USD)", REACH SVHC="No SVHC", Resistance=4.7kR, RoHS=Yes, Stock 1=21221326, Supplier 1=Digi-Key, Termination=SMD/SMT, Width=0.02inch
R33: library part Resistor, Case/Package=0402, Case Code (Metric)=1005, Manufacturer 1=Yageo, Manufacturer Part Number 1=RC0402FR-0714K7L, Max Operating Temperature=155°C, Max Power Dissipation=63mW, Min Operating Temperature=-55°C, Power Rating=62.5mW, Supplier Part Number 1=YAG2984CT-ND, Temperature Coefficient=100ppm/°C, Tolerance=1%, Voltage Rating=50V, Case Code (Imperial)=0402, ComponentLink1Description=https://datasheet.ciiva.com/12668/pyu-rc0402-51-rohs-l-6-r-12668214.pdf?src-supplier=Mouser, ComponentLink1URL=https://datasheet.ciiva.com/12668/pyu-rc0402-51-rohs-l-6-r-12668214.pdf?src-supplier=Mouser, ComponentLink2Description=https://datasheet.ciiva.com/28404/pyu-rc0402-51-rohs-l-6-28404249.pdf?src-supplier=Avnet+Europe, ComponentLink2URL=https://datasheet.ciiva.com/28404/pyu-rc0402-51-rohs-l-6-28404249.pdf?src-supplier=Avnet+Europe, ComponentLink3Description=https://datasheet.ciiva.com/16869/pyu-rc0402-51-rohs-l-6-16869068.pdf?src-supplier=Avnet+Europe, ComponentLink3URL=https://datasheet.ciiva.com/16869/pyu-rc0402-51-rohs-l-6-16869068.pdf?src-supplier=Avnet+Europe, ComponentLink4Description=https://datasheet.ciiva.com/8890/pyu-rc0402-51-rohs-l-6-8890796.pdf?src-supplier=Avnet, ComponentLink4URL=https://datasheet.ciiva.com/8890/pyu-rc0402-51-rohs-l-6-8890796.pdf?src-supplier=Avnet, ComponentLink5Description=https://datasheet.ciiva.com/26829/getdatasheetpartid-326415-26829900.pdf?src-supplier=Verical, ComponentLink5URL=https://datasheet.ciiva.com/26829/getdatasheetpartid-326415-26829900.pdf?src-supplier=Verical, Composition="Thick Film", Contact Plating=Tin,Matte, Depth=0.5mm, Features="Moisture Resistant", Height=0.016inch, Lead Free="Lead Free", Length=1mm, Military Standard=Not, Number of Terminations=2, Packaging="Tape and Reel", Pricing 1="1=0,10000, 10=0,01600, 100=0,00640, 1000=0,00289, 2500=0,00251, 5000=0,00207 (USD)", Radiation Hardening=No, Resistance=14.7kR, RoHS=Yes, Stock 1=361018, Supplier 1=Digi-Key, Termination=SMD/SMT, Width=0.02inch
R41 R79 R84: library part Resistor, Case/Package=0402, Case Code (Metric)=1005, Manufacturer 1=Susumu, Manufacturer Part Number 1=RR0510R-510-D, Max Operating Temperature=125°C, Max Power Dissipation=63mW, Min Operating Temperature=-55°C, Package Quantity=1, Supplier Part Number 1=RR05R51DCT-ND, Temperature Coefficient=100ppm/°C, Tolerance=0.5%, Voltage Rating=25V, Case Code (Imperial)=0402, ComponentLink1Description=https://datasheet.ciiva.com/2486/rr-data-sheet-2486920.pdf?src-supplier=Digi-Key, ComponentLink1URL=https://datasheet.ciiva.com/2486/rr-data-sheet-2486920.pdf?src-supplier=Digi-Key, ComponentLink2Description=https://datasheet.ciiva.com/2486/rr-data-sheet-2486921.pdf?src-supplier=Digi-Key, ComponentLink2URL=https://datasheet.ciiva.com/2486/rr-data-sheet-2486921.pdf?src-supplier=Digi-Key, ComponentLink3Description=https://datasheet.ciiva.com/2486/rr-data-sheet-2486922.pdf?src-supplier=Digi-Key, ComponentLink3URL=https://datasheet.ciiva.com/2486/rr-data-sheet-2486922.pdf?src-supplier=Digi-Key, ComponentLink4Description=https://datasheet.ciiva.com/28635/87330-28635919.pdf?src-supplier=Element14, ComponentLink4URL=https://datasheet.ciiva.com/28635/87330-28635919.pdf?src-supplier=Element14, Composition="Thin Film", Height=0.016inch, Lead Free="Lead Free", Length=0.039inch, Number of Pins=2, Number of Terminations=2, Packaging="Tape and Reel", Power Rating=63mW, Pricing 1="1=0.10000, 10=0.07400, 100=0.02850, 1000=0.01254, 2500=0.01083, 5000=0.00969 (USD)", REACH SVHC=Unknown, Resistance=51R, RoHS=Yes, Stock 1=85168, Supplier 1=Digi-Key, Termination=SMD/SMT, Voltage Rating (DC)=25V, Width=0.02inch
R46: library part Resistor, Case/Package=0603, Case Code (Metric)=1608, Manufacturer 1=Panasonic, Manufacturer Part Number 1=ERJ-3EKF15R0V, Max Operating Temperature=155°C, Max Power Dissipation=100mW, Min Operating Temperature=-55°C, Package Quantity=1, Supplier Part Number 1=P15.0HCT-ND, Temperature Coefficient=100ppm/°C, Tolerance=1%, Voltage Rating=75V, Case Code (Imperial)=0603, ComponentLink1Description=https://datasheet.ciiva.com/30238/aoa0000ce2-30238940.pdf?src-supplier=Onlinecomponents.com, ComponentLink1URL=https://datasheet.ciiva.com/30238/aoa0000ce2-30238940.pdf?src-supplier=Onlinecomponents.com, ComponentLink2Description=https://datasheet.ciiva.com/5915/aoa0000ce2-5915293.pdf?src-supplier=Farnell, ComponentLink2URL=https://datasheet.ciiva.com/5915/aoa0000ce2-5915293.pdf?src-supplier=Farnell, ComponentLink3Description=https://datasheet.ciiva.com/9192/aoa0000ce2-9192958.pdf?src-supplier=Avnet, ComponentLink3URL=https://datasheet.ciiva.com/9192/aoa0000ce2-9192958.pdf?src-supplier=Avnet, ComponentLink4Description=https://datasheet.ciiva.com/46373/1678782-46373800.pdf?src-supplier=Element14, ComponentLink4URL=https://datasheet.ciiva.com/46373/1678782-46373800.pdf?src-supplier=Element14, ComponentLink5Description=https://datasheet.ciiva.com/46373/1678782-46373801.pdf?src-supplier=Element14, ComponentLink5URL=https://datasheet.ciiva.com/46373/1678782-46373801.pdf?src-supplier=Element14, ComponentLink6Description=https://datasheet.ciiva.com/16770/70260748-16770860.pdf?src-supplier=Allied+Electronics, ComponentLink6URL=https://datasheet.ciiva.com/16770/70260748-16770860.pdf?src-supplier=Allied+Electronics, ComponentLink7Description=https://datasheet.ciiva.com/22682/1678782-22682189.pdf?src-supplier=Element14, ComponentLink7URL=https://datasheet.ciiva.com/22682/1678782-22682189.pdf?src-supplier=Element14, Composition="Thick Film", Contact Plating=Tin, Depth=0.8mm, Features="Automotive AEC-Q200", Height=0.022inch, Lead Free="Lead Free", Length=1.6mm, Military Standard=Not, Mount="Surface Mount", Number of Pins=2, Number of Terminations=2, Packaging="Tape and Reel", Power Rating=100mW, Pricing 1="1=0.10000, 10=0.06500, 100=0.02640, 1000=0.01186, 2500=0.01029 (USD)", Radiation Hardening=No, REACH SVHC="No SVHC", Resistance=15R, RoHS=Yes, Stock 1=100546, Supplier 1=Digi-Key, Termination=SMD/SMT, Voltage Rating (DC)=75V, Weight=7.1E-05oz, Width=0.031inch, Working Voltage=75V
R50 R65 R86: library part Resistor, Case/Package=0402, Case Code (Metric)=1005, Manufacturer 1=Susumu, Manufacturer Part Number 1=RR0510P-104-D, Max Operating Temperature=125°C, Max Power Dissipation=63mW, Min Operating Temperature=-55°C, Package Quantity=1, Supplier Part Number 1=RR05P100KDCT-ND, Temperature Coefficient=25ppm/°C, Tolerance=0.5%, Voltage Rating=25V, Case Code (Imperial)=0402, ComponentLink1Description=https://datasheet.ciiva.com/2486/rr-data-sheet-2486809.pdf?src-supplier=Digi-Key, ComponentLink1URL=https://datasheet.ciiva.com/2486/rr-data-sheet-2486809.pdf?src-supplier=Digi-Key, ComponentLink2Description=https://datasheet.ciiva.com/2486/rr-data-sheet-2486810.pdf?src-supplier=Digi-Key, ComponentLink2URL=https://datasheet.ciiva.com/2486/rr-data-sheet-2486810.pdf?src-supplier=Digi-Key, ComponentLink3Description=https://datasheet.ciiva.com/2486/rr-data-sheet-2486811.pdf?src-supplier=Digi-Key, ComponentLink3URL=https://datasheet.ciiva.com/2486/rr-data-sheet-2486811.pdf?src-supplier=Digi-Key, Composition="Thin Film", Height=0.016inch, Lead Free="Lead Free", Length=0.039inch, Number of Pins=2, Number of Terminations=2, Packaging="Tape and Reel", Power Rating=63mW, Pricing 1="1=0.10000, 10=0.07400, 100=0.02850, 1000=0.01254, 2500=0.01083, 5000=0.00969 (USD)", REACH SVHC="No SVHC", Resistance=100kR, RoHS=Yes, Supplier 1=Digi-Key, Termination=SMD/SMT, Voltage Rating (DC)=25V, Width=0.02inch, Working Voltage=25V
  R50 R86: Stock 1=211732
  R65: Stock 1=221998
R51 R66: library part Resistor, Case/Package=0402, Case Code (Metric)=1005, Manufacturer 1=Susumu, Manufacturer Part Number 1=RR0510P-2492-D, Max Operating Temperature=125°C, Max Power Dissipation=63mW, Min Operating Temperature=-55°C, Package Quantity=1, Power Rating=62.5mW, Supplier Part Number 1=RR05P24.9KDCT-ND, Temperature Coefficient=25ppm/°C, Tolerance=0.5%, Voltage Rating=25V, Voltage Rating (DC)=50V, Case Code (Imperial)=0402, ComponentLink1Description=https://datasheet.ciiva.com/2525/rr-data-sheet-2525146.pdf?src-supplier=Digi-Key, ComponentLink1URL=https://datasheet.ciiva.com/2525/rr-data-sheet-2525146.pdf?src-supplier=Digi-Key, ComponentLink2Description=https://datasheet.ciiva.com/2525/rr-data-sheet-2525147.pdf?src-supplier=Digi-Key, ComponentLink2URL=https://datasheet.ciiva.com/2525/rr-data-sheet-2525147.pdf?src-supplier=Digi-Key, ComponentLink3Description=https://datasheet.ciiva.com/2525/rr-data-sheet-2525148.pdf?src-supplier=Digi-Key, ComponentLink3URL=https://datasheet.ciiva.com/2525/rr-data-sheet-2525148.pdf?src-supplier=Digi-Key, Composition="Thin Film", Height=0.016inch, Lead Free="Lead Free", Length=0.039inch, Number of Terminations=2, Packaging="Tape and Reel", Pricing 1="1=0.10000, 10=0.07400, 100=0.02850, 1000=0.01254, 2500=0.01083, 5000=0.00969 (USD)", Resistance=24.9kR, RoHS=Yes, Supplier 1=Digi-Key, Termination=SMD/SMT, Weight=2.3E-05oz, Width=0.5mm, Working Voltage=25V
  R51: Stock 1=39015
  R66: Stock 1=40830
R52: library part Resistor, Case/Package=0402, Manufacturer 1="Stackpole Electronics", Manufacturer Part Number 1=RNCF0402DTE21K5, Max Operating Temperature=155°C, Max Power Dissipation=63mW, Min Operating Temperature=-55°C, Package Quantity=10000, Supplier Part Number 1=RNCF0402DTE21K5CT-ND, Temperature Coefficient=25ppm/°C, Tolerance=0.5%, ComponentLink1Description=https://www.seielect.com/Catalog/SEI-RNCF.pdf?src-supplier=Digi-Key, ComponentLink1URL=https://www.seielect.com/Catalog/SEI-RNCF.pdf?src-supplier=Digi-Key, Composition="Thin Film", Features="Moisture Resistant", Height=0.016inch, Length=0.039inch, Mount="Surface Mount", Number of Terminations=2, Packaging="Tape and Reel", Pricing 1="1=0.13000, 10=0.11400, 25=0.07920, 50=0.06160, 100=0.04400, 250=0.03432, 500=0.02728, 1000=0.01936, 5000=0.01496 (USD)", Resistance=21.5kR, RoHS=Yes, Stock 1=19890, Supplier 1=Digi-Key, Width=0.02inch
R54 R56: library part Resistor, Case/Package=0402, Case Code (Metric)=1005, Manufacturer 1=Panasonic, Manufacturer Part Number 1=ERA-2AEB3572X, Max Operating Temperature=155°C, Max Power Dissipation=63mW, Min Operating Temperature=-55°C, Package Quantity=10000, Supplier Part Number 1=P35.7KDCCT-ND, Temperature Coefficient=25ppm/°C, Tolerance=0.1%, Voltage Rating=25V, Voltage Rating (DC)=50V, Case Code (Imperial)=0402, ComponentLink1Description=https://datasheet.ciiva.com/9190/aoa0000ce26-9190303.pdf?src-supplier=Avnet, ComponentLink1URL=https://datasheet.ciiva.com/9190/aoa0000ce26-9190303.pdf?src-supplier=Avnet, Composition="Thin Film,Metal Film", Contact Plating=Tin, Height=0.016inch, Lead Free="Lead Free", Length=0.039inch, Mount="Surface Mount", Number of Terminations=2, Packaging="Tape and Reel", Power Rating=63mW, Pricing 1="1=0.45000, 10=0.32100, 100=0.12830, 1000=0.06322, 2500=0.05858, 5000=0.05300 (USD)", REACH SVHC=Unknown, Resistance=35.7kR, RoHS=Yes, Stock 1=8618, Supplier 1=Digi-Key, Width=0.02inch
R55 R58: library part Resistor, Case/Package=0402, Case Code (Metric)=1005, Manufacturer 1=Panasonic, Manufacturer Part Number 1=ERA-2AEB1022X, Max Operating Temperature=155°C, Max Power Dissipation=63mW, Min Operating Temperature=-55°C, Package Quantity=1, Supplier Part Number 1=P10.2KDCCT-ND, Temperature Coefficient=25ppm/°C, Tolerance=0.1%, Voltage Rating=25V, Voltage Rating (DC)=50V, Case Code (Imperial)=0402, ComponentLink1Description=https://datasheet.ciiva.com/24059/aoa0000ce26-32660-24059830.pdf?src-supplier=Mouser, ComponentLink1URL=https://datasheet.ciiva.com/24059/aoa0000ce26-32660-24059830.pdf?src-supplier=Mouser, Composition="Metal Film,Thin Film", Contact Plating=Tin, Depth=0.5mm, Features="Automotive AEC-Q200", Height=0.016inch, Lead Free="Lead Free", Length=1mm, Military Standard=Not, Mount="Surface Mount", Number of Terminations=2, Packaging="Tape and Reel", Power Rating=63mW, Pricing 1="1=0.45000, 10=0.32100, 100=0.12830, 1000=0.06324, 2500=0.05859, 5000=0.05301 (USD)", Resistance=10.2kR, RoHS=Yes, Stock 1=231443, Supplier 1=Digi-Key, Termination=SMD/SMT, Width=0.5mm